# Altium PCB Balancer-v7.0.1.PcbDoc (part 3 of 3)
Units mil, origin at the board's own origin, x right, y up, seen from the top; angles counter-clockwise.
Board outline 2856.3 x 1161.42 mil, 2 copper layers (Top Layer, Bottom Layer), stack 30.709 mil thick; 20 components, 16 nets, 58 pads, 112 vias.
Unrouted connection lines stored in the file: 10.
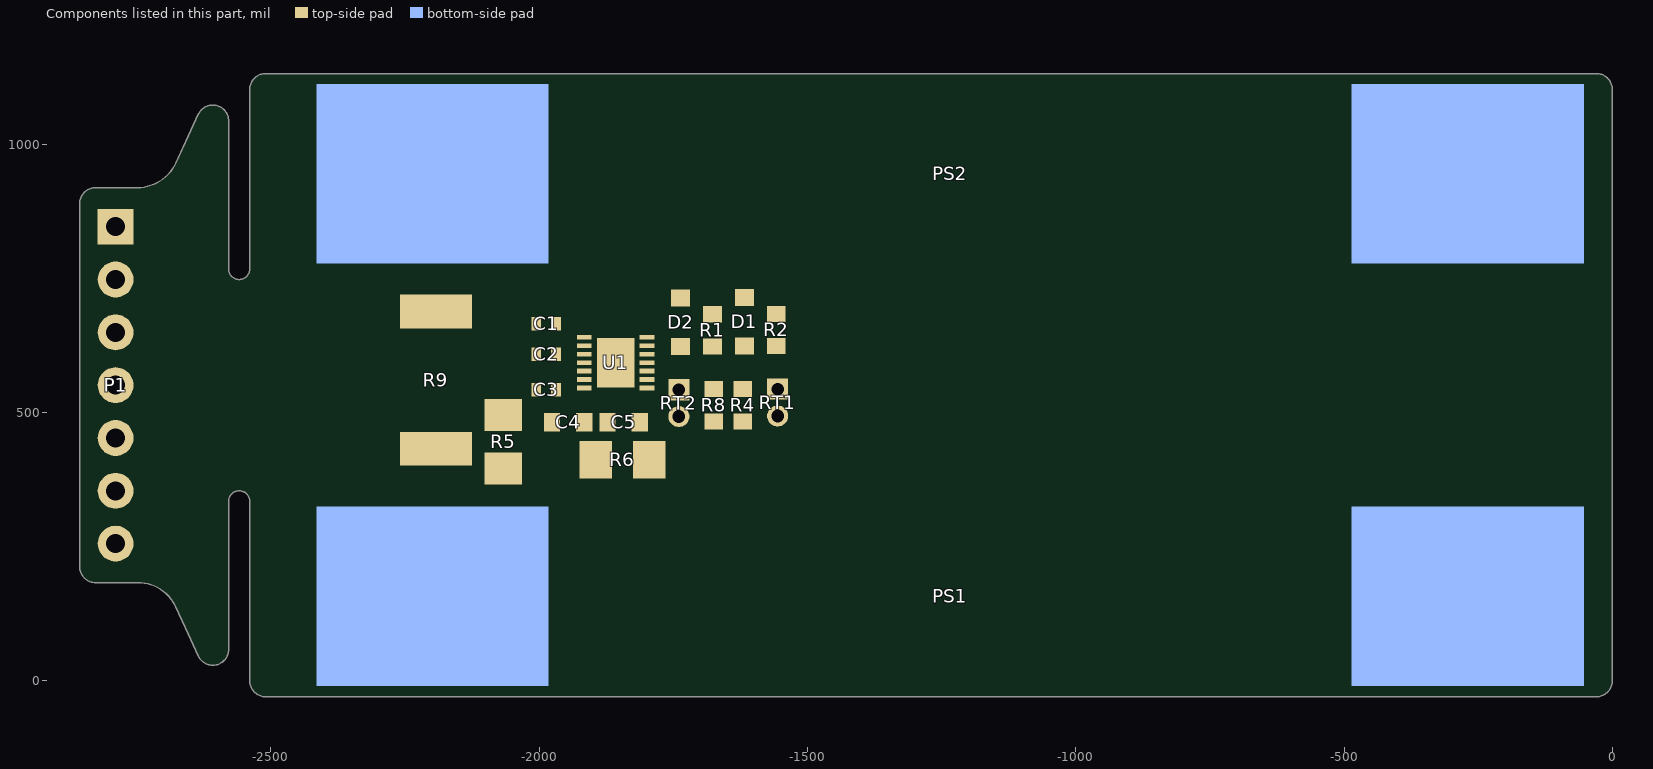
[diagram p2: the components of this part, seen from the top]

## Silkscreen, mask and mechanical layers (free items; w line width, h text height) (continued)
Fabrication:
  drawing of 191 lines, arcs and shapes, not listed
  text "Layer" at 566.74,536 h60
  text "Name" at 976.65,536 h60
  text "Material" at 1906.4,536 h60
  text "Thickness" at 2766.16,536 h60
  text "Constant" at 3416,536 h60
  text "Board Layer Stack" at 3985.86,536 h60
  text "Top Overlay" at 976.65,416 h60
  text "Top Solder" at 976.65,296 h60
  text "Solder Resist" at 1906.4,296 h60
  text "0.40mil" at 2766.16,296 h60
  text "3.5" at 3416,296 h60
  text "1" at 566.74,176 h60
  text "Top Layer" at 976.65,176 h60
  text "2.95mil" at 2766.16,176 h60
  text "Dielectric 1" at 976.65,56 h60
  text "FR-4" at 1906.4,56 h60
  text "24.80mil" at 2766.16,56 h60
  text "4.8" at 3416,56 h60
  text "2" at 566.74,-64 h60
  text "Bottom Layer" at 976.65,-64 h60
  text "2.95mil" at 2766.16,-64 h60
  text "Bottom Solder" at 976.65,-184 h60
  text "Solder Resist" at 1906.4,-184 h60
  text "0.40mil" at 2766.16,-184 h60
  text "3.5" at 3416,-184 h60
  text "Bottom Overlay" at 976.65,-304 h60
  text "Total board thickness:" at 566.74,-424 h60
  text "31.51mil" at 2766.16,-424 h60
Drill Drawing:
  circle w10: c588.85,1393.33 r33.33
  lines w10: 555.52,1060 622.18,1060 622.18,1126.67 555.52,1126.67 555.52,1060 ; 555.52,1276.67 622.18,1276.67 588.85,1210 555.52,1276.67
  lines w15: 495.72,1015 7505.83,1015 ; 495.72,1465 7505.83,1465 ; 1046.6,865 1046.6,1615 ; 1636.44,865 1636.44,1615 ; 2736.12,865 2736.12,1615 ; 3242,865 3242,1615 ; 3975.8,865 3975.8,1615 ; 5475.35,865 5475.35,1615 ; 6065.2,865 6065.2,1615 ; 6811,865 6811,1615 ; 495.72,865 7505.83,865 7505.83,1615 495.72,1615 495.72,865
  text "Symbol" at 585.72,1510 h72
  text "Count" at 1091.6,1510 h72
  text "Hole Size" at 1681.44,1510 h72
  text "Plated" at 2781.12,1510 h72
  text "Hole Type" at 3287,1510 h72
  text "Drill Layer Pair" at 4020.8,1510 h72
  text "Via/Pad" at 5520.35,1510 h72
  text "Pad Shape" at 6110.2,1510 h72
  text "Template" at 6856,1510 h72
  text "112" at 1091.6,1360 h60
  text "11.81mil (0.300mm)" at 1681.44,1360 h60
  text "PTH" at 2781.12,1360 h60
  text "Round" at 3287,1360 h60
  text "Top Layer - Bottom Layer" at 4020.8,1360 h60
  text "Via" at 5520.35,1360 h60
  text "Rounded" at 6110.2,1360 h60
  text "v60h30" at 6856,1360 h60
  text "4" at 1091.6,1210 h60
  text "23.62mil (0.600mm)" at 1681.44,1210 h60
  text "PTH" at 2781.12,1210 h60
  text "Round" at 3287,1210 h60
  text "Top Layer - Bottom Layer" at 4020.8,1210 h60
  text "Pad" at 5520.35,1210 h60
  text "(Mixed)" at 6110.2,1210 h60
  text "(Mixed)" at 6856,1210 h60
  text "7" at 1091.6,1060 h60
  text "35.43mil (0.900mm)" at 1681.44,1060 h60
  text "PTH" at 2781.12,1060 h60
  text "Round" at 3287,1060 h60
  text "Top Layer - Bottom Layer" at 4020.8,1060 h60
  text "Pad" at 5520.35,1060 h60
  text "(Mixed)" at 6110.2,1060 h60
  text "(Mixed)" at 6856,1060 h60
  text "123 Total" at 1091.6,910 h60

## Dimensions
-2539.37,0 to -2578.74,58.64 on Dimensions
-2826.77,183.1 to -2826.77,919.26 on Dimensions
-29.53,1131.89 to -29.53,-29.53 on Dimensions
-2539.37,1102.36 to 0,1102.36 on Dimensions

## Text inside footprints (layer, text, board x,y; h text height)
PS1: Bottom Overlay "+" at -1945,224.68 h118.11 r180
PS2: Bottom Overlay "+" at -519.56,915 h118.11